# Altium PCB MSP-LITO-MSPM0L2228.PcbDoc
Units mil, origin at the board's own origin, x right, y up, seen from the top; angles counter-clockwise.
Board outline 1505.03 x 2085.03 mil, 2 copper layers (Top Layer, Bottom Layer); 41 components, 70 nets, 198 pads, 66 vias.
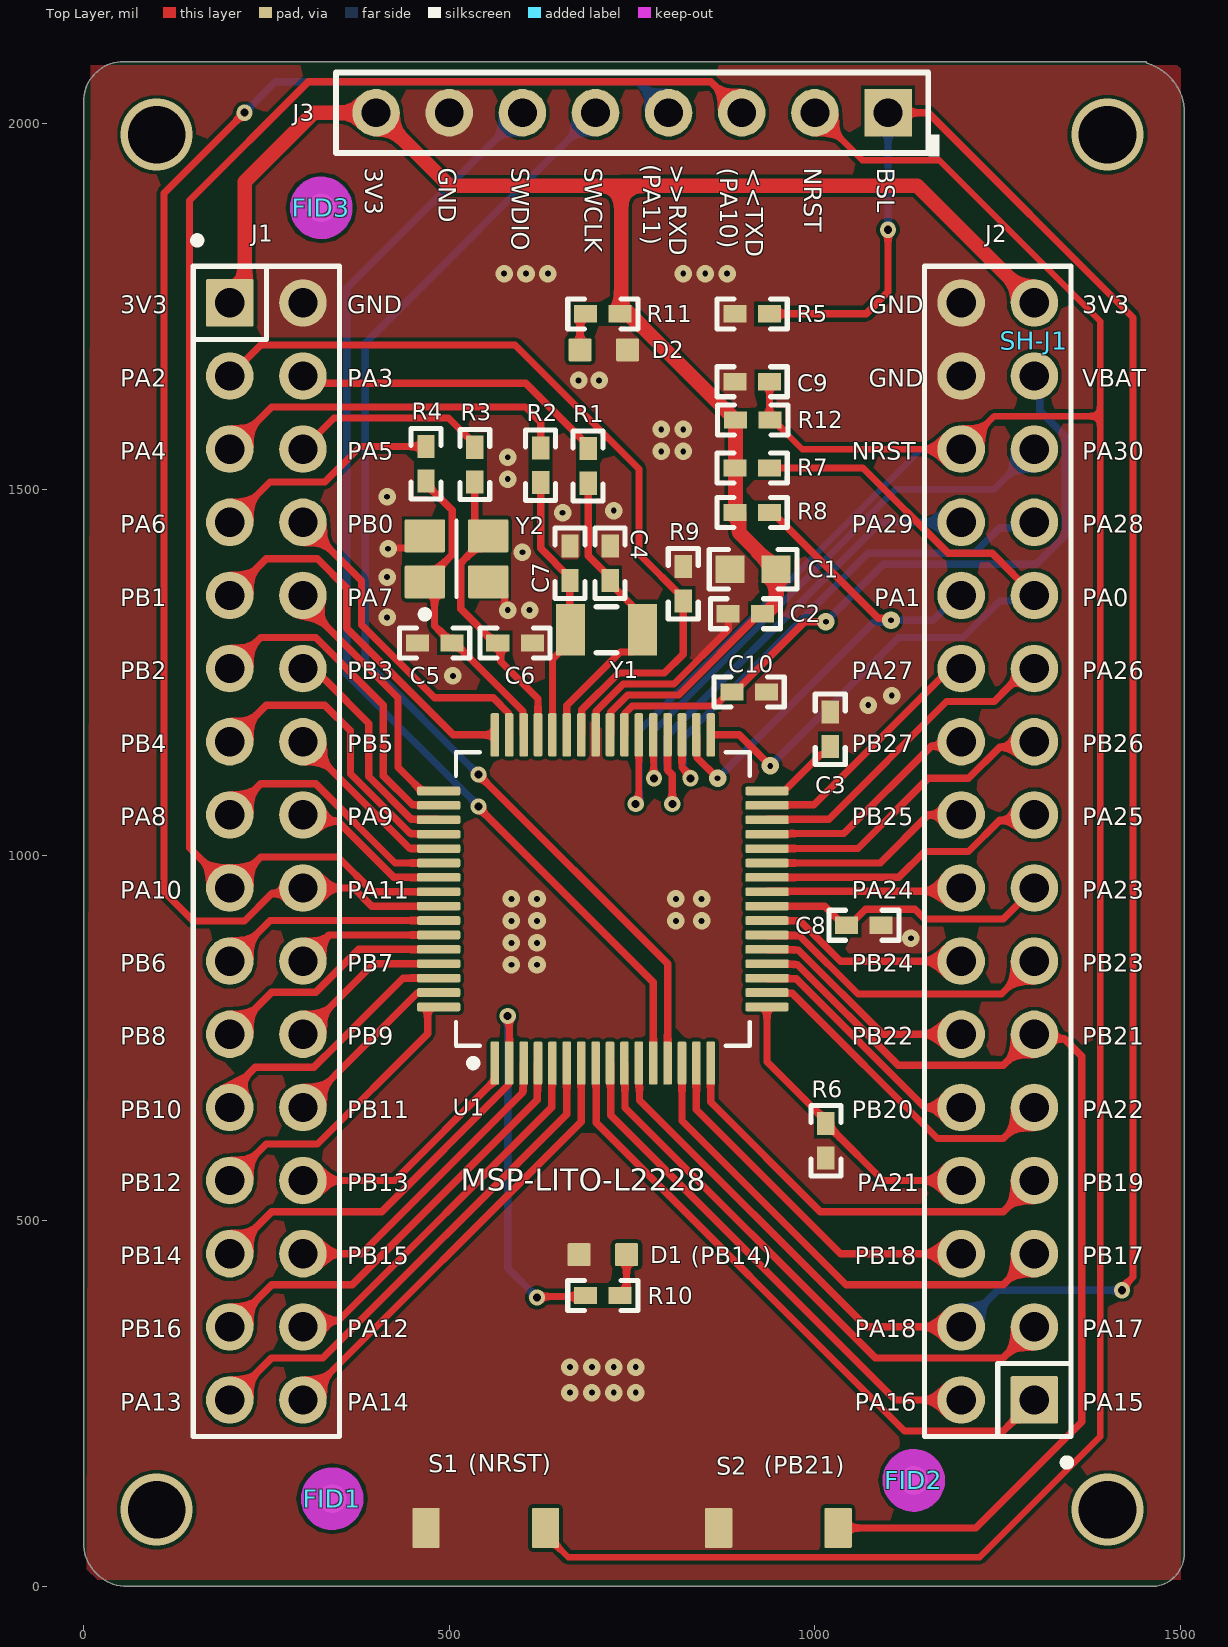
[diagram p0: Top Layer view]
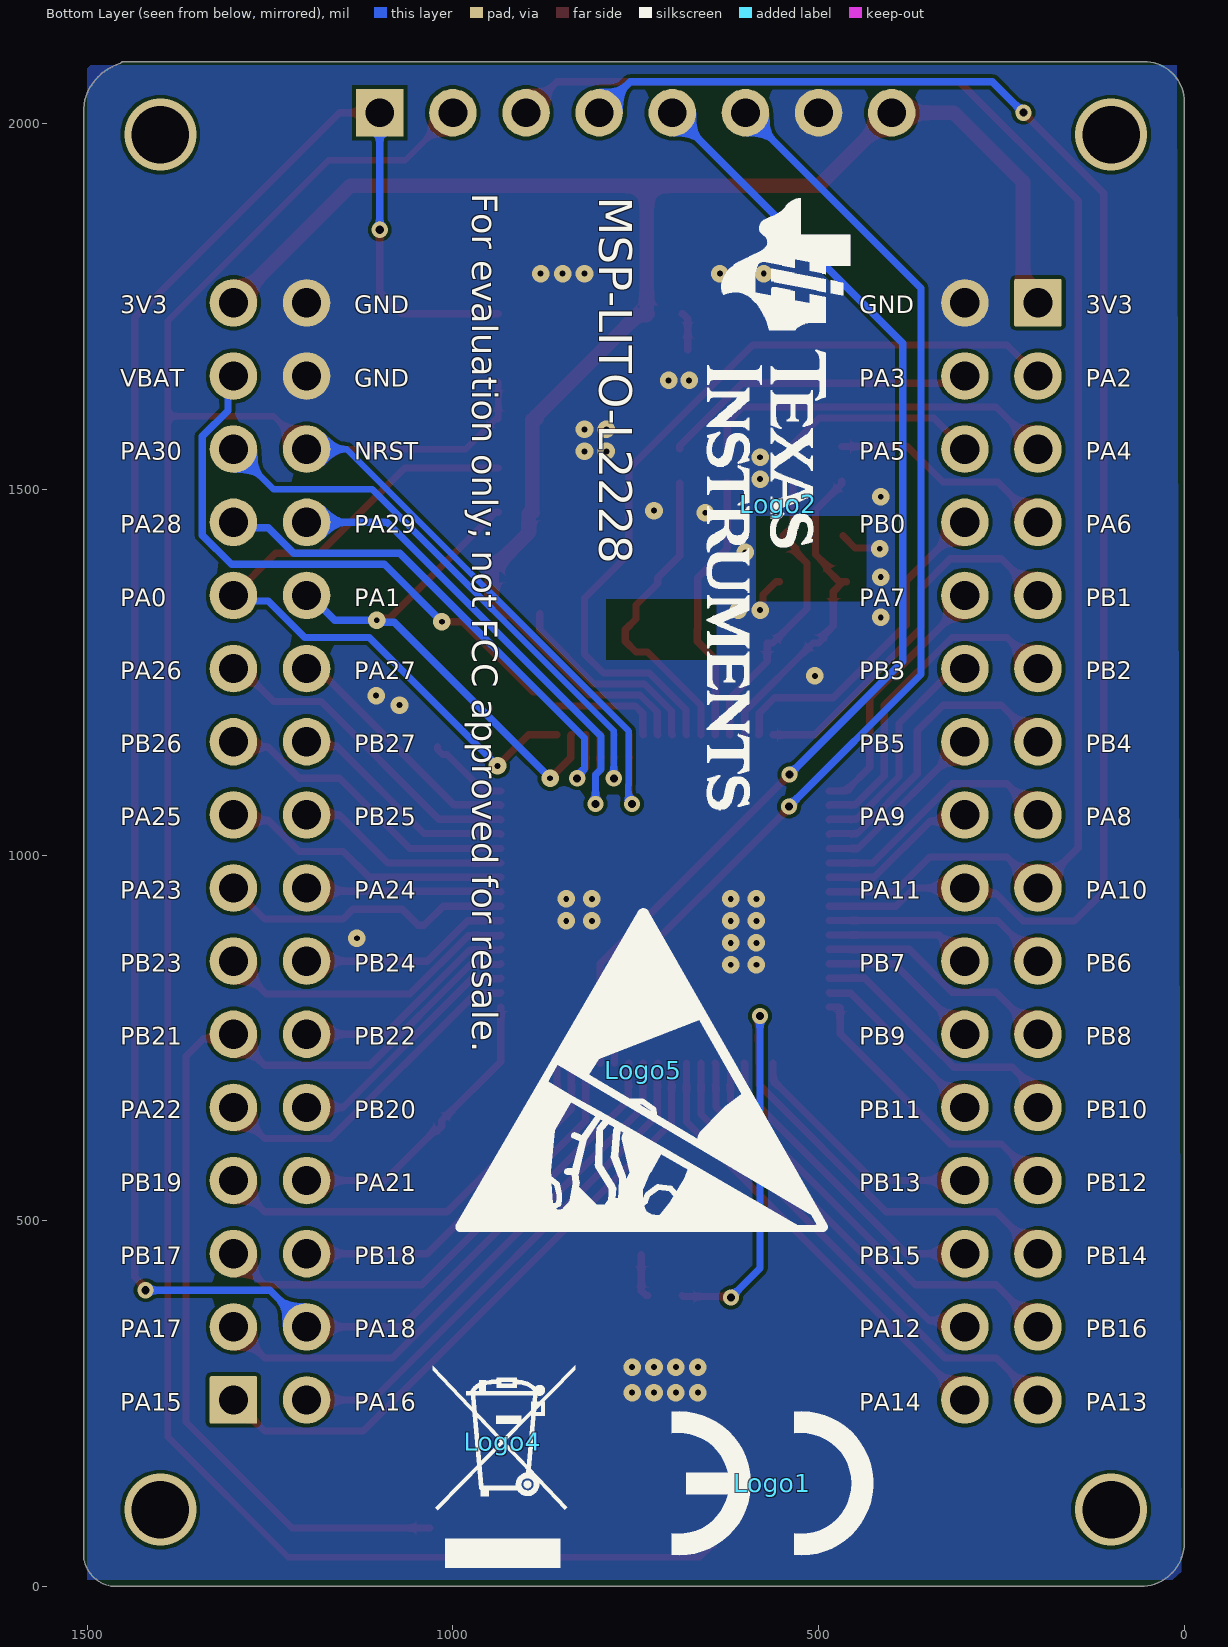
[diagram p1: Bottom Layer view, seen from below]

## Layer stack, top to bottom
Top Solder: solder mask 0.4, Solder Resist, Dk 3.5
Top Layer: signal copper 1.4
Dielectric 1: dielectric 12.6, FR-4, Dk 4.8
Bottom Layer: signal copper 1.4
Bottom Solder: solder mask 0.4, Solder Resist, Dk 3.5

## Board outline
0.01,59.98 0.01,2029.53 -0.01,2030 cw(c55,2030) 55,2085.02 1450,2085.02 cw(c1450,2080) 1454.36,2082.49 cw(c1435,2015) 1505,2020.38 1505.02,2020 1505.02,45 cw(c1460,45) 1460,-0.02 60,-0.02 cw(c60,59.98)

## Design rules (kind name [scope] priority, off if disabled: settings)
Clearance [All] p1: gap=5 ignorepadtopadclearanceinfootprint=FALSE
MinimumSolderMaskSliver [All] p1: minsoldermaskwidth=4
PolygonConnect [All] p1: connectstyle=Direct reliefconductorwidth=10 reliefentries=4 polygonreliefangle="90 Angle" airgapwidth=10
RoutingVias [All] p1: holewidth=11 width=22 viastyle="Through Hole" minholewidth=10 minwidth=10 maxholewidth=28 maxwidth=50
SilkToSilkClearance [All] p1: silktosilkclearance=0
SilkToSolderMaskClearance [IsPad] p1: minsilkscreentomaskgap=0 clearancetoexposedcopper=TRUE
SolderMaskExpansion [All] p1: expansion=1.9 istentingtop=FALSE
Width [All] p1: maxlimit=30 minlimit=8 preferedwidth=10
27 further rules are at their usual default settings.

## Classes and differential pairs
component class Shunt: SH-J1
component class Logo: Logo2
component class Header: J1 J2 J3
component class FiducialMark: FID1 FID2 FID3

## Components (designator, comment, footprint, x,y, rotation, side; value= is the part's Value field where it differs from the comment)
C1 "GRM188R60J106ME84" 0603 915.49,1390.86 r180 top value=10uF
C2 "GRM155R61H104ME14D" 0402 905,1330 r180 top value=0.1uF
C3 "GRM155R60J474KE19D" 0402 1021,1172 r90 top value=0.47uF
C4 "GCQ1555C1H140JB01D" 0402 720,1399 r270 top value=14pF
C5 "GCQ1555C1H140JB01D" 0402 480,1290 r180 top value=14pF
C6 "GCQ1555C1H140JB01D" 0402 590,1290 r0 top value=14pF
C7 "GCQ1555C1H140JB01D" 0402 665,1399 r270 top value=14pF
C8 "GRM155R61E105KA12D" 0402 1067,904 r0 top value=1uF
C9 "GRM155R71E103KA01D" 0402 914.23,1647.16 r180 top value=0.01uF
C10 "GRM155R61E105KA12D" 0402 910,1223 r0 top value=1uF
D1 "SML-D12U1WT86" LED_SMLD12_RED 710,453.64 r180 top value=Red
D2 "SML-D12U1WT86" LED_SMLD12_RED 711.38,1690.89 r0 top value=Red
FID1 "Fiducial" Fiducial10-20 340,120 r0 top
FID2 "Fiducial" Fiducial10-20 1135,145 r0 top
FID3 "Fiducial" Fiducial10-20 325,1885 r90 top
J1 "TSW-116-07-G-D" TSW-116-07-G-D 250,1005 r270 top
J2 "TSW-116-07-G-D" TSW-116-07-G-D 1250,1005 r90 top
J3 "PEC08SAAN" SULLINS_PEC08SAAN 750,2015 r180 top
Logo1 "CE Mark" CE_Mark_5mm 563,141 r0 bottom
Logo2 "Texas Instruments" TI_Stacked_Overlay_Small 555,1480 r270 bottom
Logo3 "FCC disclaimer" FCC_disclaimer -635,1085 r90 top
Logo4 "WEEE logo" WEEE_Minimum 932,198 r180 bottom
Logo5 "ESD Susceptible" ESD_Overlay_Large 740,706 r180 bottom
R1 "RC0402JR-070RL" 0402 690,1532 r270 top value=0
R2 "RC0402JR-070RL" 0402 625,1533 r270 top value=0
R3 "RC0402JR-070RL" 0402 535,1534 r270 top value=0
R4 "RC0402JR-070RL" 0402 468.19,1535 r270 top value=0
R5 "RC0402FR-0747KL" 0402 914.22,1740 r180 top value=47.0k
R6 "RC0402JR-070RL" 0402 1015,609.48 r90 top value=0
R7 "RC0402FR-072K2L" 0402 914.22,1529.12 r180 top value=2.20k
R8 "RC0402FR-072K2L" 0402 914.22,1468.54 r180 top value=2.20k
R9 "RG1005P-104-B-T5" 0402 820,1371 r90 top value=100k
R10 "RC0402FR-071KL" 0402 710,397.73 r180 top value=1.00k
R11 "RC0402FR-071KL" 0402 710,1740 r0 top value=1.00k
R12 "RC0402FR-0747KL" 0402 915,1595 r180 top value=47.0k
S1 "TL1015AF160QG" SW_TL1015AF160QG 550,80 r0 top
S2 "TL1015AF160QG" SW_TL1015AF160QG 950,80 r0 top
SH-J1 "SNT-100-BK-G" SNT-100-BK-G 1300,1703 r90 top value=VDD:VBAT
U1 "MSPM0L2228SPM" PM0064A-MFG 710,940 r90 top
Y1 "X1A0001410014" Epson_FC-135 715,1308 r0 top
Y2 "X1E0000210179" FP-X1E0000210179_TSX-3225-MFG 510,1405 r0 top

## Footprints (in the part's own frame and the unit in brackets; to place one, negate y for a bottom-side part, rotate by r counter-clockwise, add the part's x,y. Pads: shape width x height; smd on the part's side, far side on the other; paste and mask are expansions set on the pad)
0402 [mm] "0402 from SM-752 data"
  rect 0.8x0.6 smd: 1(-0.6,0) 2(0.6,0)
  silkscreen extent -1.22,-0.52 1.22,0.52, body extent -0.55,-0.3 0.55,0.3, height 0.6
0603 [mm] "0603 from SM-752 data"
  rect 1x0.95 smd: 1(-0.8,0) 2(0.8,0)
  silkscreen extent -1.52,-0.69 1.52,0.69, body extent -0.87,-0.47 0.87,0.47, height 1
CE_Mark_5mm [mil] "Minimum text height for CE Mark"
  silkscreen extent -138,-98 138,98
Epson_FC-135 [mm] "SMD, 2-Leads, Body 3.2x1.5mm"
  rect 1x1.8 smd: 1(-1.25,0) 2(1.25,0)
  silkscreen extent -0.35,-0.8 0.35,0.8, body extent -1.65,-0.8 1.65,0.8, height 0.9
ESD_Overlay_Large [mil]
  silkscreen extent -254,-219 250,219
FCC_disclaimer [mil]
Fiducial10-20 [mm]
  round 1 smd mask+0.5: 1(0,0)
  Top Layer keep-out circle w1.178: c0,0 r0.5
FP-X1E0000210179_TSX-3225-MFG [mm]
  rrect9% 1.4x1.15 smd paste+0 mask+0: 1(-1.1,-0.8) 2(1.1,-0.8) 3(1.1,0.8) 4(-1.1,0.8)
  silkscreen extent -1.22,-2.05 0,1.33, body extent -1.9,-1.47 1.9,1.47, height 0.25
LED_SMLD12_RED [mm] "SMD, 2-Leads, Body 1.6x0.8mm"
  rrect12% 0.8x0.8 smd: 1(-0.825,0) 2(0.825,0)
  body extent -0.8,-0.4 0.8,0.4, height 0.55
PM0064A-MFG [mm]
  rrect33% 1.5x0.3 smd paste+0 mask+0: 1(-5.7,3.75) 2(-5.7,3.25) 3(-5.7,2.75) 4(-5.7,2.25) 5(-5.7,1.75) 6(-5.7,1.25) 7(-5.7,0.75) 8(-5.7,0.25) 9(-5.7,-0.25) 10(-5.7,-0.75) 11(-5.7,-1.25) 12(-5.7,-1.75) 13(-5.7,-2.25) 14(-5.7,-2.75) 15(-5.7,-3.25) 16(-5.7,-3.75) 33(5.7,-3.75) 34(5.7,-3.25) 35(5.7,-2.75) 36(5.7,-2.25) 37(5.7,-1.75) 38(5.7,-1.25) 39(5.7,-0.75) 40(5.7,-0.25) 41(5.7,0.25) 42(5.7,0.75) 43(5.7,1.25) 44(5.7,1.75) 45(5.7,2.25) 46(5.7,2.75) 47(5.7,3.25) 48(5.7,3.75)
  rrect33% 0.3x1.5 smd paste+0 mask+0: 17(-3.75,-5.7) 18(-3.25,-5.7) 19(-2.75,-5.7) 20(-2.25,-5.7) 21(-1.75,-5.7) 22(-1.25,-5.7) 23(-0.75,-5.7) 24(-0.25,-5.7) 25(0.25,-5.7) 26(0.75,-5.7) 27(1.25,-5.7) 28(1.75,-5.7) 29(2.25,-5.7) 30(2.75,-5.7) 31(3.25,-5.7) 32(3.75,-5.7) 49(3.75,5.7) 50(3.25,5.7) 51(2.75,5.7) 52(2.25,5.7) 53(1.75,5.7) 54(1.25,5.7) 55(0.75,5.7) 56(0.25,5.7) 57(-0.25,5.7) 58(-0.75,5.7) 59(-1.25,5.7) 60(-1.75,5.7) 61(-2.25,5.7) 62(-2.75,5.7) 63(-3.25,5.7) 64(-3.75,5.7)
  silkscreen extent -5.82,-5.1 5.1,5.1, body extent -6.55,-6.55 6.55,6.55, height 0.25
SNT-100-BK-G [mil] "Samtec STEP model"
  round 1 on Mech3: 0(0,0)
  body extent -100,-50 100,50, height 344
SULLINS_PEC08SAAN [mm] "SULLINS"
  rect 1.65x1.65 hole 1: 1(-8.89,0)
  round 1.65 hole 1: 2(-6.35,0) 3(-3.81,0) 4(-1.27,0) 5(1.27,0) 6(3.81,0) 7(6.35,0) 8(8.89,0)
  silkscreen extent -10.67,-1.4 10.29,1.52, body extent -10.29,-1.33 10.29,1.33, height 8.38
SW_TL1015AF160QG [mm] "E-Switch"
  rrect11% 0.95x1.4 smd: 1(-2.075,0) 2(2.075,0)
  body extent -2.3,-1.5 2.3,1.5, height 2
TI_Stacked_Overlay_Small [mil]
  silkscreen extent -418,-98 418,98
TSW-116-07-G-D [mm] "Samtec 100mil, 2x16, 230 mil above insulator"
  rrect6% 1.65x1.65 hole 1.016: 1(-19.05,-1.27)
  round 1.65 hole 1.016: 2(-19.05,1.27) 3(-16.51,-1.27) 4(-16.51,1.27) 5(-13.97,-1.27) 6(-13.97,1.27) 7(-11.43,-1.27) 8(-11.43,1.27) 9(-8.89,-1.27) 10(-8.89,1.27) 11(-6.35,-1.27) 12(-6.35,1.27) 13(-3.81,-1.27) 14(-3.81,1.27) 15(-1.27,-1.27) 16(-1.27,1.27) 17(1.27,-1.27) 18(1.27,1.27) 19(3.81,-1.27) 20(3.81,1.27) 21(6.35,-1.27) 22(6.35,1.27) 23(8.89,-1.27) 24(8.89,1.27) 25(11.43,-1.27) 26(11.43,1.27) 27(13.97,-1.27) 28(13.97,1.27) 29(16.51,-1.27) 30(16.51,1.27) 31(19.05,-1.27) 32(19.05,1.27)
  silkscreen extent -21.34,-2.54 20.32,2.54, body extent -20.32,-2.54 20.32,2.54, height 8.38
WEEE_Minimum [mil] "WEEElie bin"
  silkscreen extent -95,-172 99,104

## Part data
C1: library part CMP-0007304-5, "CAP, CERM, 10 uF, 6.3 V, +/- 20%, X5R, 0603", Cap_Case=0603, Manufacturer=MuRata, Supplier Part Number 1=490-7316-1-ND, TempCo=X5R, Tolerance_%=20%, Value1=Unknown, Value2=6.3V, ValueDisplayed=10uF, AEC Category=Q200, AEC Qualified=?, Cap_F=10µF, ComponentLink1Description="Datasheet link", ComponentLink1URL=http://search.murata.co.jp/Ceramy/image/img/A01X/G101/ENG/GRM188R60J106ME84-01.pdf, CompType=Capacitor, LatestRevisionDate=2017-03-09, MountType=SMT, PackageReference=0603, PartNumber=GRM188R60J106ME84, Polarized=N, Published=2008-06-19, Publisher="Texas Instruments", RoHS=Y, SizeArea_mm2=1.28, SizeAreaWB_mm2=4.68, SizeX_mm=1.6, SizeY_mm=0.8, SizeZ_mm=1, Supplier 1=Digi-Key, TaMax_C=85°C, TaMin_C=-55°C, Technology=Ceramic, U/M=EA, VDC_V=6.3V
C2: library part CMP-0006614-2, "CAP, CERM, 0.1 uF, 50 V, +/- 20%, X5R, 0402", Cap_Case=0402, Manufacturer=MuRata, Supplier Part Number 1=GRM155R61H104ME14D-ND, TempCo=X5R, Tolerance_%=20%, Value1=Unknown, Value2=50V, ValueDisplayed=0.1uF, AEC Category=Q200, AEC Grade=N/A, AEC Qualified=N, Cap_F=100nF, ComponentLink1Description="Datasheet link", ComponentLink1URL=http://search.murata.co.jp/Ceramy/image/img/A01X/G101/ENG/GRM155R61H104ME14-01.pdf, CompType=Capacitor, LatestRevisionDate=2017-03-09, MountType=SMT, PackageReference=0402, PartNumber=GRM155R61H104ME14D, Polarized=N, Published=2008-06-19, Publisher="Texas Instruments", RoHS=Y, SizeArea_mm2=0.5, SizeAreaWB_mm2=3, SizeX_mm=1, SizeY_mm=0.5, SizeZ_mm=0.6, Supplier 1=Digi-Key, Supplier 2=Mouser, Supplier Part Number 2=81-GRM155R61H104ME4D, TaMax_C=85°C, TaMin_C=-55°C, Technology=Ceramic, U/M=EA, VDC_V=50V
C3: library part CMP-0006551-2, "CAP, CERM, 0.47 uF, 6.3 V, +/- 10%, X5R, 0402", Cap_Case=0402, Manufacturer=MuRata, Supplier Part Number 1=490-3266-1-ND, TempCo=X5R, Tolerance_%=10%, Value1=Unknown, Value2=6.3V, ValueDisplayed=0.47uF, AEC Category=Q200, AEC Qualified=?, Cap_F=470nF, ComponentLink1Description="Datasheet link", ComponentLink1URL=http://search.murata.co.jp/Ceramy/PnsearchViewAction.do?HnOFG=ON&HnNFG=ON&SEL_CNT=50&sLang=en&sKey=GRM155R60J474KE19D&x=9&y=9&search=startwith, CompType=Capacitor, LatestRevisionDate=2017-03-09, MountType=SMT, PackageReference=0402, PartNumber=GRM155R60J474KE19D, Polarized=N, Published=2008-06-19, Publisher="Texas Instruments", RoHS=Y, SizeArea_mm2=0.5, SizeAreaWB_mm2=3, SizeX_mm=1, SizeY_mm=0.5, SizeZ_mm=0.6, Supplier 1=Digi-Key, Supplier 2=Newark, Supplier 3=Mouser, Supplier Part Number 2=38K1645, Supplier Part Number 3=81-GRM155R60J474KE9D, TaMax_C=85°C, TaMin_C=-55°C, Technology=Ceramic, U/M=EA, VDC_V=6.3V
C4 C5 C6 C7: library part CMP-0860834-1, "CAP, CERM, 14 pF, 50 V,+/- 5%, C0G/NP0, AEC-Q200 Grade 1, 0402", Cap_Case=0402, Manufacturer=MuRata, TempCo=C0G/NP0, Tolerance_%=5%, Value2=50V, ValueDisplayed=14pF, AEC Category=Q200, AEC Grade=1, AEC Qualified=Y, Cap_F=14pF, ComponentLink1Description="Datasheet link", ComponentLink1URL=https://search.murata.co.jp/Ceramy/image/img/A01X/G101/ENG/GCQ1555C1H140JB01-01.pdf, CompType=Capacitor, MountType=SMT, PackageReference=0402, PartNumber=GCQ1555C1H140JB01D, Polarized=N, RoHS=Y, SizeArea_mm2=0.5, SizeAreaWB_mm2=3, SizeX_mm=1, SizeY_mm=0.5, SizeZ_mm=0.6, TaMax_C=125°C, TaMin_C=-55°C, Technology=Ceramic, U/M=EA, VDC_V=50V
C8: library part CMP-0006608-2, "CAP, CERM, 1 uF, 25 V, +/- 10%, X5R, 0402", Cap_Case=0402, Manufacturer=MuRata, Supplier Part Number 1=490-10017-1-ND, TempCo=X5R, Tolerance_%=10%, Value1=Unknown, Value2=25V, ValueDisplayed=DNC, AEC Category=Q200, AEC Qualified=?, Cap_F=1µF, ComponentLink1Description="Datasheet link", ComponentLink1URL=http://psearch.murata.com/capacitor/product/GRM155R61E105KA12%23.pdf, CompType=Capacitor, LatestRevisionDate=2017-03-09, MountType=SMT, PackageReference=0402, PartNumber=GRM155R61E105KA12D, Polarized=N, Published=2008-06-19, Publisher="Texas Instruments", RoHS=Y, SizeArea_mm2=0.5, SizeAreaWB_mm2=3, SizeX_mm=1, SizeY_mm=0.5, SizeZ_mm=0.6, Supplier 1=Digi-Key, Supplier 2=Newark, Supplier 3=Mouser, Supplier Part Number 2=48W5730, Supplier Part Number 3=81-GRM155R61E105KA2D, TaMax_C=85°C, TaMin_C=-55°C, Technology=Ceramic, U/M=EA, VDC_V=25V
C9: library part CMP-0006658-2, "CAP, CERM, 0.01 uF, 25 V, +/- 10%, X7R, 0402", Cap_Case=0402, Manufacturer=MuRata, Supplier Part Number 1=490-1312-1-ND, TempCo=X7R, Tolerance_%=10%, Value1=Unknown, Value2=25V, ValueDisplayed=0.01uF, AEC Category=Q200, AEC Qualified=?, Cap_F=10nF, ComponentLink1Description="Datasheet link", ComponentLink1URL=http://search.murata.co.jp/Ceramy/PnsearchViewAction.do?HnOFG=ON&HnNFG=ON&SEL_CNT=50&sLang=en&sKey=GRM155R71E103KA01D&x=9&y=9&search=startwith, CompType=Capacitor, LatestRevisionDate=2017-03-09, MountType=SMT, PackageReference=0402, PartNumber=GRM155R71E103KA01D, Polarized=N, Published=2008-06-19, Publisher="Texas Instruments", RoHS=Y, SizeArea_mm2=0.5, SizeAreaWB_mm2=3, SizeX_mm=1, SizeY_mm=0.5, SizeZ_mm=0.6, Supplier 1=Digi-Key, Supplier 2=Mouser, Supplier 3=Farnell, Supplier Part Number 2=81-GRM36X103K25, Supplier Part Number 3=8819734, TaMax_C=125°C, TaMin_C=-55°C, Technology=Ceramic, U/M=EA, VDC_V=25V
C10: library part CMP-0006608-2, "CAP, CERM, 1 uF, 25 V, +/- 10%, X5R, 0402", Cap_Case=0402, Manufacturer=MuRata, Supplier Part Number 1=490-10017-1-ND, TempCo=X5R, Tolerance_%=10%, Value1=Unknown, Value2=25V, AEC Category=Q200, AEC Qualified=?, Cap_F=1µF, ComponentLink1Description="Datasheet link", ComponentLink1URL=http://psearch.murata.com/capacitor/product/GRM155R61E105KA12%23.pdf, CompType=Capacitor, LatestRevisionDate=2017-03-09, MountType=SMT, PackageReference=0402, PartNumber=GRM155R61E105KA12D, Polarized=N, Published=2008-06-19, Publisher="Texas Instruments", RoHS=Y, SizeArea_mm2=0.5, SizeAreaWB_mm2=3, SizeX_mm=1, SizeY_mm=0.5, SizeZ_mm=0.6, Supplier 1=Digi-Key, Supplier 2=Newark, Supplier 3=Mouser, Supplier Part Number 2=48W5730, Supplier Part Number 3=81-GRM155R61E105KA2D, TaMax_C=85°C, TaMin_C=-55°C, Technology=Ceramic, U/M=EA, VDC_V=25V
D1 D2: library part CMP-0086209-1, "LED, Red, SMD", Color=Red, Manufacturer=Rohm, Power_TotalModule=54mW, Value1=0.054W, Value2=2.2V, ComponentLink1Description="Datasheet link", ComponentLink1URL=https://www.rohm.com/datasheet/SML-D12U1W, CompType=LED, Io_A=20mA, Ir_A=10mA, MountType=SMT, PackageReference=1.6x0.8mm, PartNumber=SML-D12U1WT86, RoHS=Y, SizeArea_mm2=1.28, SizeAreaWB_mm2=4.68, SizeX_mm=1.6, SizeY_mm=0.8, SizeZ_mm=0.65, Type=?, Vf_V=2.2V, Vr_V=5V
FID1 FID2 FID3: library part CMP-0077181-1, "Fiducial mark.  There is nothing to buy or mount.", Manufacturer=N/A, ClassName=FiducialMark, CompType=Fiducial, MountType=N/A, PackageReference=N/A, PartNumber=N/A
J1 J2: library part CMP-0075429-1, "Header, 100mil, 16x2, Gold, TH", Color=Black, Current_A=6.3A, Manufacturer=Samtec, Supplier Part Number 1=SAM1028-16-ND, Voltage_V=550V, Cert_CSA=Y, Cert_CULUS=N, Cert_UL=Y, Cert_VDE=N, ClassName=Header, CNHeader=True, ComponentLink1Description="Datasheet URL", ComponentLink1URL=http://samtec.com/ftppub/pdf/TSW_TH.PDF, CompType=Header, ContactFinish=Gold, CT=False, Gender=Male, Green_EU RoHS=Passed, Green_EU RoHS-2=Passed, Green_Lifecycle=Active, Green_REACh=Passed, LatestRevisionDate=2017-07-12, MountType=TH, Orientation=Vertical, PackageReference="16x2 Header", PartNumber=TSW-116-07-G-D, PinCount=32, Pitch_mm=2.54, Publisher="Texas Instruments", RoHS=Y, Row_Count=2, RowSpacing_mm=2.54, Shrouded=N, Supplier 1=Digi-Key
J3: library part CMP-0054563-1, "Header, 100mil, 8x1, Tin, TH", Color=Black, Current_A=3A, Manufacturer="Sullins Connector Solutions", Supplier Part Number 1=S1012E-08-ND, Voltage_V=1.8kV, Cert_UL=Y, ClassName=Header, CNHeader=TRUE, ComponentLink1Description="Datasheet URL", ComponentLink1URL=http://www.sullinscorp.com/catalogs/77_PAGE108-109_.100_MALE_HDR.pdf, CompType=Header, ContactFinish=Tin, CT=FALSE, Gender=Male, Green_EU RoHS=Incomplete, Green_EU RoHS-2=Incomplete, Green_Lifecycle="Not Set", Green_REACh=Incomplete, LatestRevisionDate=26/05/2017, MountType=TH, Orientation=Vertical, PackageReference="Header, 8x1, 100mil, TH", PartNumber=PEC08SAAN, PinCount=8, Pitch_mm=2.54, Publisher="Texas Instruments", RoHS=Y, Row_Count=1, Shrouded=N, Supplier 1=Digi-Key
Logo1: library part CMP-0074844-2, Manufacturer="Texas Instruments", AEC Category=Q200, ComponentLink1Description="Datasheet Link", ComponentLink1URL=http://www.ti.com/lit/ds/symlink/GPN.pdf, ComponentLink2Description="Product Folder", ComponentLink2URL=http://www.ti.com/product/GPN, ComponentLink3Description="Online Datasheet", ComponentLink3URL=http://www.ti.com/product/GPN/datasheet, CompType=IC, LatestRevisionDate=2017-07-06, Lib Reference="CE Mark", PartNumber="CE Mark", Published=2009-03-03, Publisher="Texas Instruments", SymbolCreator=a0412235
Logo2: library part CMP-0074838-1, "Texas Instrument Corporate Signature", ClassName=Logo, LatestRevisionDate=2017-07-06, Lib Reference=TI_Logo, PartNumber="Texas Instruments", Published=2009-03-03, Publisher="Texas Instruments", SymbolCreator=a0412235, SymbolVersion=2011-08-22
Logo3: library part CMP-0074847-1, "FCC_disclaimer", LatestRevisionDate=2017-07-06, Lib Reference=FCC_disclaimer, PartNumber="FCC disclaimer", Published=2009-03-03, Publisher="Texas Instruments"
Logo4: library part CMP-0074769-4, Manufacturer="Texas Instruments", AEC Category=Q200, ComponentLink1Description="Datasheet Link", ComponentLink1URL=http://www.ti.com/lit/ds/symlink/GPN.pdf, ComponentLink2Description="Product Folder", ComponentLink2URL=http://www.ti.com/product/GPN, ComponentLink3Description="Online Datasheet", ComponentLink3URL=http://www.ti.com/product/GPN/datasheet, CompType=IC, Lib Reference="WEEE logo", PartNumber="WEEE logo"
Logo5: library part CMP-0074840-1, "ESD Susceptible Symbol", LatestRevisionDate=2017-07-06, Lib Reference=ESD_Susceptible, PartNumber="ESD Susceptible", Published=2009-03-03, Publisher="Texas Instruments", SymbolCreator=a0412235, SymbolVersion=2011-08-22
R1 R2 R3 R4 R6: library part CMP-0027004-2, "RES, 0, 5%, 0.063 W, 0402", Manufacturer="Yageo America", Power_W=63mW, Supplier Part Number 1=311-0.0JRCT-ND, TempCo="200 ppm/C", Tolerance_%=5%, Value2=0.063W, Value_Code=0000, ValueDisplayed=DNC, AEC Category=Q200, AEC Qualified=?, ComponentLink1Description="Datasheet link", ComponentLink1URL=http://www.yageo.com/pdf/Pu-RC0402_51_PbFree_L_2.pdf, CompType=Resistor, EIA_Code=E24, LatestRevisionDate=2017-03-09, MountType=SMT, PackageReference=0402, PartNumber=RC0402JR-070RL, Published=2008-06-26, Publisher="Texas Instruments", Res_ohm=0, RoHS=Y, SizeArea_mm2=0.5, SizeX_mm=1, SizeY_mm=0.5, SizeZ_mm=0.6, Supplier 1=Digi-Key, Supplier 2=Mouser, Supplier 3=Farnell, Supplier Part Number 2=603-RC0402JR-070RL, Supplier Part Number 3=9232516, Technology="Thick Film", U/M=EA, Value1=5%, VDC_V=50V
R5 R12: library part CMP-0026737-1, "RES, 47.0 k, 1%, 0.0625 W, 0402", Manufacturer="Yageo America", Power_W=62.5mW, Supplier Part Number 1=311-47.0KLRCT-ND, TempCo="100 ppm/C", Tolerance_%=1%, Value2=0.0625W, Value_Code=47k0, ValueDisplayed=47.0k, AEC Category=Q200, AEC Grade=N/A, AEC Qualified=N, ComponentLink1Description="Datasheet link", ComponentLink1URL=http://www.yageo.com/documents/recent/PYu-RC0402_51_RoHS_L_6_r.pdf, CompType=Resistor, LatestRevisionDate=2017-03-09, MountType=SMT, PackageReference=0402, PartNumber=RC0402FR-0747KL, Published=2008-06-26, Publisher="Texas Instruments", Res_ohm=47k, RoHS=Y, SizeArea_mm2=0.5, SizeX_mm=1, SizeY_mm=0.5, SizeZ_mm=0.6, Supplier 1=Digi-Key, Supplier 2=Newark, Supplier 3=Mouser, Supplier Part Number 2=67R9937, Supplier Part Number 3=603-RC0402FR-0747KL, Technology="Thick Film", U/M=EA, Value1=1%, VDC_V=50V
R7 R8: library part CMP-0026729-1, "RES, 2.20 k, 1%, 0.063 W, 0402", Manufacturer="Yageo America", Power_W=63mW, Supplier Part Number 1=311-2.20KLRCT-ND, TempCo="100 ppm/C", Tolerance_%=1%, Value2=0.063W, Value_Code=2k20, ValueDisplayed=2.20k, AEC Category=Q200, AEC Grade=N/A, AEC Qualified=N, ComponentLink1Description="Datasheet link", ComponentLink1URL=http://www.yageo.com/documents/recent/PYu-RC_Group_51_RoHS_L_1.pdf, CompType=Resistor, LatestRevisionDate=2017-03-09, MountType=SMT, PackageReference=0402, PartNumber=RC0402FR-072K2L, Published=2008-06-26, Publisher="Texas Instruments", Res_ohm=2.2k, RoHS=Y, SizeArea_mm2=0.5, SizeX_mm=1, SizeY_mm=0.5, SizeZ_mm=0.6, Supplier 1=Digi-Key, Supplier 2=Newark, Supplier 3=Mouser, Supplier Part Number 2=67R9903, Supplier Part Number 3=603-RC0402FR-072K2L, Technology="Thick Film", U/M=EA, Value1=1%
R9: library part CMP-0026815-1, "RES, 100 k, 0.1%, 0.063 W, 0402", Manufacturer="Susumu Co Ltd", Power_W=63mW, Supplier Part Number 1=RG10P100KBCT-ND, TempCo="25 ppm/C", Tolerance_%=0.1%, Value2=0.063W, Value_Code=100k, AEC Category=Q200, AEC Qualified=?, ComponentLink1Description="Datasheet link", ComponentLink1URL=http://www.susumu-usa.com/pdf/RG_Data_Sheet.pdf, CompType=Resistor, EIA_Code=E192, LatestRevisionDate=2017-03-09, MountType=SMT, PackageReference=0402, PartNumber=RG1005P-104-B-T5, Published=2008-06-26, Publisher="Texas Instruments", Res_ohm=100k, RoHS=Y, SizeArea_mm2=0.5, SizeX_mm=1, SizeY_mm=0.5, SizeZ_mm=0.6, Supplier 1=Digi-Key, Supplier 2=Newark, Supplier 3=Mouser, Supplier Part Number 2=85K1460, Supplier Part Number 3=754-RG1005P-104-B-T5, Technology="Thin Film", U/M=EA, Value1=0.1%, ValueDisplayed=100k
R10 R11: library part CMP-0026725-1, "RES, 1.00 k, 1%, 0.0625 W, 0402", Manufacturer="Yageo America", Power_W=62.5mW, Supplier Part Number 1=311-1.00KLRCT-ND, TempCo="100 ppm/C", Tolerance_%=1%, Value2=0.0625W, Value_Code=1k00, ValueDisplayed=1.00k, AEC Category=Q200, AEC Grade=N/A, AEC Qualified=N, ComponentLink1Description="Datasheet link", ComponentLink1URL=http://www.yageo.com/NewPortal/yageodocoutput?fileName=/pdf/R-Chip/PYu-RC_Group_51_RoHS_L_4.pdf, CompType=Resistor, EIA_Code=E96, LatestRevisionDate=2017-03-09, MountType=SMT, PackageReference=0402, PartNumber=RC0402FR-071KL, Published=2008-06-26, Publisher="Texas Instruments", Res_ohm=1k, RoHS=Y, SizeArea_mm2=0.5, SizeX_mm=1, SizeY_mm=0.5, SizeZ_mm=0.6, Supplier 1=Digi-Key, Supplier 2=Newark, Supplier 3=Mouser, Supplier Part Number 2=98K7497, Supplier Part Number 3=603-RC0402FR-071KL, Technology="Thick Film", U/M=EA, Value1=1%, VDC_V=50V
S1 S2: library part CMP-0002143-3, "Switch, Tactile, SPST-NO, 0.05A, 12V, SMT", CurrentRating_mA=50A, Manufacturer=E-Switch, Supplier Part Number 1=EG4344CT-ND, Circuit=SPST-NO, ComponentLink1Description="Datasheet URL", ComponentLink1URL=http://spec.e-switch.com/P-J/P420000.pdf, CompType=Switch, LatestRevisionDate=2017-03-09, MountType=SMT, Orientation="Top Actuated", PackageReference="Switch, 4.4x2x2.9 mm", PartNumber=TL1015AF160QG, PositionCount=1, Publisher="Texas Instruments", RoHS=Y, Supplier 1=Digi-Key, Supplier 2=Newark, Supplier 3=Mouser, Supplier Part Number 2=15N4458, Supplier Part Number 3=612-TL1015AF, SwitchFunction=Off-Mom, VDC_V=12V
SH-J1: library part CMP-0003623-3, "Shunt, 100mil, Gold plated, Black", Alternate Manufacturer=3M, Alternate PartNumber=969102-0000-DA, Manufacturer=Samtec, Supplier Part Number 1=SAM8858-ND, ClassName=Shunt, ComponentLink1Description="Datasheet Link", ComponentLink1URL=http://www.samtec.com/ftppub/pdf/SNT.PDF, CompType=Shunt, MountType=N/A, PackageReference=Shunt, PartNumber=SNT-100-BK-G, RoHS=Y, Supplier 1=Digi-Key
U1: library part CMP-0121756-1, "Mixed-Signal Microcontroller, LQFP64", Frequency_Fixed=32MHz, Manufacturer="Texas Instruments", Max Supply Voltage=3.6V, Min Supply Voltage=1.62V, Operating Temperature Range="-40°C to +125°C", AEC Qualified=No, Core Architecture="ARM Cortex-M0+", Data Bus Width=32bits, Datasheet Path=datasheets/IC-MSPM0L2228SPM.pdf, helpURL=https://upverter.com/upn/revision/e3d91dc85fdb9748/, Interface=I2C,SPI,UART,LIN,IrDA,SMBus,Other, Memory Size=256KBytes, Memory Type=FLASH, Number Of A/D Converters=1, Number Of Adc Channels=26, Number Of Cores=1, Number Of I2C Channels=3, Number Of I/Os=59, Number Of Pwm Channels=18, Number Of Spi Channels=2, Number Of Timers/Counters=6, Number Of Uart Channels=5, PackageReference=LQFP64, Part Number=MSPM0L2228SPM, PartNumber=MSPM0L2228SPM, Ram Size=32KBytes, RoHS=UNKNOWN, SizeZ_mm=1.6mm, Standoff Height=0.05mm
Y1: library part CMP-0004693-3, "Crystal, 32.768 KHz, 12.5 pF, SMD", Frequency_Fixed=32.768kHz, Manufacturer=Epson, ComponentLink1Description="Datasheet Link", ComponentLink1URL=https://support.epson.biz/td/api/doc_check.php?dl=brief_FC-135R_en.pdf, CompType=Crystal, MountType=SMT, PackageReference="SMD, 2-Leads, Body 3.2x1.5mm", PartNumber=X1A0001410014, RoHS=Y, TaMax_C=85°C, TaMin_C=-40°C
Y2: library part CMP-0098168-2, "Crystal 40MHz ±10ppm (Tol) ±20ppm (Stability) 12pF FUND 40Ohm 4-Pin Mini-CSMD T/R", Frequency Stability=20ppm, Frequency Tolerance=10ppm, Frequency_Fixed=40MHz, Load Capacitance=12pF, Manufacturer="Seiko Epson", Operating Temperature Range="-40°C to +105°C", AEC Qualified=No, ComponentLink1Description=Datasheet, ComponentLink1URL=https://support.epson.biz/td/api/doc_check.php?mode=dl&lang=en&Parts=X1E0000210179, datasheet=https://support.epson.biz/td/api/doc_check.php?mode=dl&lang=en&Parts=X1E0000210179, Datasheet Path=datasheets/Crys-X1E0000210179.pdf, Esr=40, helpURL=https://upverter.com/upn/revision/08d7803d4c2c7fb7/, Lead Free=Yes, PackageReference=TSX-3225, Part Number=X1E0000210179, PartNumber=X1E0000210179, RoHS=TRUE, Series=TSX-3225, SizeZ_mm=0.6mm, Tolerance_%=10ppm

## Via types
v1: diameter 24, hole 8, Top Layer to Bottom Layer, tented both sides, 51 vias
v2: diameter 22, hole 11, Top Layer to Bottom Layer, tented both sides, 11 vias
v3: diameter 98.43, hole 78.74, Top Layer to Bottom Layer, 4 vias

## Nets (pads, with @x,y where several pads share a name; then routed paths per layer and width w, separated by ;. In a path a pad name is that pad's centre, name@x,y a point inside that pad or via, vN(x,y) a via of type N, cw(c..) or ccw(c..) an arc to the next point about the centre after c; other vN are vias at no path point)
3V3: C1.1 C2.1 J1.1 J2.31 J3.8 R7.2 R8.2 R11.2 R12.2 U1.40 | length 2386.9
  Top Layer w10: U1.40 720.75,1165.31 720.75,1195.59 744.09,1218.94 813.62,1218.94 924.68,1330 C2.1
  Top Layer w20: J1.1 220.53,1775.53 220.53,1920.53 315,2015 J3.8 500,1915 735,1915 ; R8.2 894.53,1468.54 896.34,1466.73 896.34,1440.52 946,1390.86 C1.1 946.98,1344.42 C2.1@932.56,1330 ; R8.2@891.38,1470 R12.2 887.44,1595 885.63,1596.81 885.63,1600.75 748.19,1738.19 735.43,1738.19 R11.2 735,1741.38 735,1915 ; J2.31 1140,1915 735,1915
GND: C1.2 C2.2 C3.2 C4.1 C5.2 C6.2 C7.1 C8.2 C9.2 C10.2 D1.2 D2.2 J1.2 J2.30 J2.32 J3.7 R5.2 R6.1 R9.2 S1.1 S2.1 U1.41 Y2.2 Y2.4 | length 391.4
  Top Layer w10: v1(416.4,1418.92) 417.38,1419.91 450.11,1419.91 Y2.4 ; Y2.2 558.23,1373.5 575.87,1355.87 575.87,1342.92 580,1338.79 v1(580,1335) ; U1.41 701.06,1165.31 701.06,1197.12 737.88,1233.94 807.41,1233.94 881.38,1307.91 C2.2
  other v1: 665,265 695,265 725,265 755,265 665,300 695,300 725,300 755,300 585,850 620,850 585,880 620,880 1131.21,886.24 585,910 620,910 810,910 845,910 585,940 620,940 810,940 845,940 1073,1205 1105,1218 505,1245 415,1325 610,1335 415,1380 600,1414 655,1468 725,1471 415,1490 580,1514 580,1544 790,1552 820,1552 790,1582 820,1582 677,1649 705,1649 575,1795 605,1795 635,1795 820,1795 850,1795 880,1795
NetC3_1: C3.1 U1.32 | length 114.1
  Top Layer w10: U1.32 958.03,1087.64 1008.02,1137.63 1014.19,1137.63 1021,1144.44 C3.1
NetD1_1: D1.1 R10.1 | length 60.8
  Top Layer w10: R10.1 735.67,397.73 742.48,404.54 D1.1
NetD2_1: D2.1 R11.1 | length 52.6
  Top Layer w10: D2.1 678.9,1733.19 685.71,1740 R11.1
PA.0: J2.23 R7.1 U1.33 | length 990.7
  Top Layer w10: U1.33 896.59,1164.41 v1(939,1122) ; R7.1 1065.81,1529.12 1182.4,1412.52 1242.48,1412.52 J2.23
  Bottom Layer w10: v1(939,1122) 1114.48,1297.48 1202.56,1297.48 1252.52,1347.44 1292.44,1347.44 J2.23
PA.1: J2.24 R8.1 U1.34 | length 735.3
  Top Layer w10: U1.34 838.86,1163.5 838.86,1133.14 v1(867,1105) ; R8.1 941.78,1468.54 1086.64,1323.68 1101.32,1323.68 v1(1104,1321)
  Bottom Layer w10: v1(867,1105) 1080.32,1318.32 1101.32,1318.32 v1(1104,1321) 1161.5,1321 1195.5,1355 J2.24
PA.2_ROSC: J1.3 R9.1 U1.42 | length 1130.2
  Top Layer w10: J1.3 242.48,1697.48 589.84,1697.48 759.57,1527.75 759.57,1411.74 820,1351.32 R9.1 820,1274.79 794.14,1248.94 731.67,1248.94 681.38,1198.65 681.38,1165.31 U1.42
PA.3-: J1.4 R1.1 | length 433.5
  Top Layer w10: J1.4 310,1645 604.56,1645 690,1559.56 R1.1
PA.3_LFXIN: C4.2 R1.2 U1.43 Y1.2 | length 426.8
  Top Layer w10: U1.43 660.79,1204.57 733.78,1277.57 749.53,1277.57 764.21,1292.25 Y1.2 749.53,1322.69 749.53,1341.91 720,1371.44 C4.2 720,1379.32 690,1409.32 R1.2
PA.4-: J1.5 R2.1 | length 492.6
  Top Layer w10: J1.5 257.52,1612.52 604.23,1612.52 625,1591.75 R2.1
PA.4_LFXOUT: C7.2 R2.2 U1.44 Y1.1 | length 372.1
  Top Layer w10: R2.2 625,1419.32 665,1379.32 C7.2 665,1308.79 Y1.1 665.79,1292.25 641.1,1267.57 U1.44
PA.5-: J1.6 R3.1 | length 271.4
  Top Layer w10: J1.6 342.52,1597.52 499.04,1597.52 535,1561.56 R3.1
PA.5_HFXIN: C6.1 R3.2 U1.45 Y2.3 | length 413.5
  Top Layer w10: R3.2 535,1449.88 548.39,1436.5 530.75,1418.86 530.75,1413.94 522.95,1406.14 522.8,1406.14 515.75,1399.09 515.75,1336.69 562.44,1290 C6.1 570.32,1290 570.32,1264.68 621.42,1213.58 U1.45
PA.6-: J1.7 R4.1 | length 311.1
  Top Layer w10: J1.7 255,1510 330,1510 378.62,1558.62 R4.1
PA.6_HFXOUT: C5.1 R4.2 U1.46 Y2.1 | length 445.8
  Top Layer w10: Y2.1@461.77,1373.5 Y2.1 ; R4.2 468.19,1507.44 504.25,1471.38 504.25,1410.91 489.25,1395.91 489.25,1391.14 471.61,1373.5 Y2.1 ; U1.46 600.83,1165.31 600.83,1196.73 507.56,1290 499.68,1290 492.87,1296.81 492.87,1300.75 480,1313.62 480,1360.2 Y2.1
PA.7: J1.10 U1.49 | length 358.1
  Top Layer w10: J1.10 300,1345 430,1215 430,1120 461.06,1088.94 461.06,1088.54 461.97,1087.64 U1.49
PA.8: J1.15 U1.54 | length 348
  Top Layer w10: J1.15 242.48,1097.48 317.6,1097.48 425.87,989.21 U1.54
PA.9: J1.16 U1.55 | length 221
  Top Layer w10: J1.16 308.61,1046.39 347.48,1046.39 424.34,969.53 U1.55
PA.10_Debug_TX: J1.17 J3.3 U1.56 | length 2125.6
  Top Layer w10: U1.56 395.55,949.84 347.91,997.48 242.48,997.48 J1.17 145,1010 145,1895 307.48,2057.48 857.52,2057.48 J3.3
PA.11_Debug_RX: J1.18 J3.4 U1.57 | length 2146.8
  Top Layer w10: v2(220,2015) 110,1905 110,950 150,910 220,910 257.44,947.44 292.44,947.44 J1.18 369.18,955 394.02,930.16 U1.57
  Bottom Layer w10: v2(220,2015) 262.48,2057.48 757.52,2057.48 J3.4
PA.12: J1.30 U1.5 | length 525.3
  Top Layer w10: J1.30 308.57,363.57 348.57,363.57 640.2,655.2 640.2,714.69 U1.5
PA.13: J1.31 U1.6 | length 692.5
  Top Layer w10: J1.31 257.52,312.52 327.52,312.52 660.79,645.79 U1.6
PA.14: J1.32 U1.7 | length 618.2
  Top Layer w10: J1.32 680.47,635.47 U1.7
PA.15: J2.1 U1.8 | length 873.1
  Top Layer w10: U1.8 701.06,714.69 701.06,633.94 1122.48,212.52 1257.52,212.52 J2.1
PA.16: J2.2 U1.9 | length 712.2
  Top Layer w10: U1.9 720.75,714.69 720.75,644.25 1110,255 J2.2
PA.17: J2.3 U1.10 | length 780.2
  Top Layer w10: U1.10 740.43,714.69 740.43,654.57 1082.48,312.52 1257.52,312.52 J2.3
PA.18_BSL: J2.4 J3.1 R5.1 U1.11 | length 3066.8
  Top Layer w10: U1.11 760.12,714.69 760.12,664.88 1070,355 J2.4 ; R5.1 1070,1740 1100,1770 v2(1100,1855) ; J3.1 1155,2015 1435,1735 1435,423.25 1420,408.25 v2(1420,405)
  Bottom Layer w10: v2(1100,1855) J3.1 ; J2.4 1250,405 v2(1420,405)
PA.21: J2.8 R6.2 U1.17 | length 412.3
  Top Layer w10: U1.17 934.41,717.63 1015,637.04 R6.2 1015,629.17 1021.81,622.36 1025.75,622.36 1093.11,555 J2.8
PA.22: J2.9 U1.18 | length 465.8
  Top Layer w10: U1.18 935.31,811.14 968.86,811.14 1167.48,612.52 1257.52,612.52 J2.9
PA.23: C8.1 J2.15 U1.24 | length 408.6
  Top Layer w10: U1.24 1013.28,930.16 1039.44,904 C8.1 1047.32,904 1069.13,925.81 1136.72,925.81 1150.01,912.52 1257.52,912.52 J2.15
PA.24: J2.16 U1.25 | length 267.7
  Top Layer w10: U1.25 935.31,950.75 1195.75,950.75 J2.16
PA.25: J2.17 U1.26 | length 401
  Top Layer w10: U1.26 1114.53,969.53 1150,1005 1210.08,1005 1252.52,1047.44 1292.44,1047.44 J2.17
PA.26: J2.21 U1.30 | length 451.2
  Top Layer w10: U1.30 935.31,1049.17 1019.17,1049.17 1180,1210 1245,1210 1265,1230 1265.13,1230 1290.13,1255 J2.21
PA.27: J2.22 U1.31 | length 343.1
  Top Layer w10: U1.31 935.31,1068.86 998.86,1068.86 1168.93,1238.93 1169.05,1238.93 1185.13,1255 J2.22
PA.28: J2.25 U1.35 | length 725.6
  Top Layer w10: U1.35 818.27,1119.88 830,1108.15 v2(830,1105)
  Bottom Layer w10: v2(830,1105) 830,1108.25 820,1118.25 820,1160 1072.48,1412.48 1217.56,1412.48 1252.52,1447.44 1292.44,1447.44 J2.25
PA.29: J2.26 U1.36 | length 716.5
  Top Layer w10: U1.36 798.58,1116.12 805,1109.7 v2(805,1070)
  Bottom Layer w10: v2(805,1070) 805,1109.7 797.35,1117.35 797.35,1162.35 1090,1455 J2.26
PA.30: J2.27 U1.37 | length 804.3
  Top Layer w9: U1.37 779.45,1163.86 779.45,1105.55 v2(780,1105)
  Bottom Layer w9: v2(780,1105) 780,1170 1110,1500 1245,1500 J2.27
PB.0: J1.8 U1.47 | length 454.4
  Top Layer w10: J1.8 380,1375 380,1315 480,1215 560.21,1215 581.14,1194.06 581.14,1165.31 U1.47
PB.1: J1.9 U1.48 | length 514.9
  Top Layer w10: J1.9 250,1405 320,1405 360,1365 360,1310 505.59,1164.41 U1.48
PB.2: J1.11 U1.50 | length 454.8
  Top Layer w10: J1.11 242.48,1297.48 317.6,1297.48 410,1205.08 410,1108.64 449.78,1068.86 484.69,1068.86 U1.50
PB.3: J1.12 U1.51 | length 313.7
  Top Layer w10: J1.12 314.87,1255 330.95,1238.93 331.07,1238.93 390,1180 390,1107.43 448.25,1049.17 484.69,1049.17 U1.51
PB.4: J1.13 U1.52 | length 413.8
  Top Layer w10: J1.13 250,1205 330,1205 365,1170 365,1111.21 446.72,1029.49 484.69,1029.49 U1.52
PB.5: J1.14 U1.53 | length 246.1
  Top Layer w10: J1.14 446.1,1008.9 U1.53
PB.6: J1.19 U1.58 | length 308.6
  Top Layer w10: J1.19 255.47,910.47 U1.58
PB.7: J1.20 U1.59 | length 200.4
  Top Layer w10: J1.20 335.79,890.79 U1.59
PB.8: J1.21 U1.60 | length 333.7
  Top Layer w10: J1.21 257.52,812.52 317.6,812.52 376.18,871.1 U1.60
PB.9: J1.22 U1.61 | length 225.5
  Top Layer w10: J1.22 396.42,851.42 U1.61
PB.10: J1.23 U1.62 | length 370.5
  Top Layer w10: J1.23 210.52,665.52 210.52,685.52 235,710 315,710 328.49,723.49 ccw(c300,755) 331.51,726.51 436.73,831.73 U1.62
PB.11: J1.24 U1.63 | length 250.8
  Top Layer w10: J1.24 385.51,740.51 385.51,740.71 455.94,811.14 484.69,811.14 U1.63
PB.12: J1.25 U1.64 | length 404.9
  Top Layer w10: J1.25 250,605 320,605 470.54,755.54 470.54,791.46 471.45,792.36 U1.64
PB.13: J1.26 U1.1 | length 342.7
  Top Layer w10: J1.26 425.39,555 562.36,691.97 U1.1
PB.14: J1.27 R10.2 U1.2 | length 1041.2
  Top Layer w10: J1.27 257.52,512.52 407.72,512.52 581.14,685.94 581.14,714.69 U1.2 582.05,777.95 v2(580,780) ; v2(620,395) 621.37,396.37 685.01,396.37 R10.2
  Bottom Layer w10: v2(580,780) 580,435 v2(620,395)
PB.15: J1.28 U1.3 | length 432.4
  Top Layer w10: J1.28 380,455 600.83,675.83 600.83,714.69 U1.3
PB.16: J1.29 U1.4 | length 599.6
  Top Layer w10: J1.29 257.52,412.52 367.52,412.52 620.51,665.51 620.51,714.69 U1.4
PB.17: J2.5 U1.14 | length 671.1
  Top Layer w10: U1.14 818.27,636.73 1042.48,412.52 1257.52,412.52 J2.5
PB.18: J2.6 U1.15 | length 507.2
  Top Layer w10: U1.15 837.95,652.05 1035,455 J2.6
PB.19: J2.7 U1.16 | length 575.3
  Top Layer w10: U1.16 857.64,662.36 1007.48,512.52 1257.52,512.52 J2.7
PB.20: J2.10 U1.19 | length 338.8
  Top Layer w10: U1.19 935.31,830.83 974.32,830.83 1150.15,655 J2.10
PB.21: J2.11 S2.2 U1.20 | length 1411.5
  Top Layer w10: U1.20 935.31,850.51 975.85,850.51 1113.84,712.52 1257.52,712.52 J2.11 1306.07,748.93 1341.07,748.93 1365,725 1365,225 1220,80 S2.2
PB.22: J2.12 U1.21 | length 313.7
  Top Layer w10: U1.21 935.31,870.2 977.38,870.2 1092.57,755 J2.12
PB.23: J2.13 U1.22 | length 417.7
  Top Layer w10: U1.22 935.31,889.88 978.91,889.88 1058.79,810 1255,810 J2.13
PB.24: J2.14 U1.23 | length 288.6
  Top Layer w10: U1.23 934.6,910.28 979.72,910.28 1035,855 J2.14
PB.25: J2.18 U1.27 | length 292.8
  Top Layer w10: U1.27 1089.21,989.21 1155,1055 J2.18
PB.26: J2.19 U1.28 | length 426.1
  Top Layer w10: U1.28 1058.9,1008.9 1155,1105 1210.08,1105 1252.52,1147.44 1292.44,1147.44 J2.19
PB.27: J2.20 U1.29 | length 318
  Top Layer w10: U1.29 935.31,1029.49 1039.49,1029.49 1158.93,1148.93 1193.93,1148.93 J2.20
R\S\T\: C9.1 J2.28 J3.2 R12.1 S1.2 U1.38 | length 4209.2
  Top Layer w9: S1.2 631.69,71.14 662.83,40 1225,40 1390,205 1390,1600 ; v2@759.21,1077.73 U1.38 ; C9.1 937.85,1595.77 941.79,1595.77 982.56,1555 J2.28 1245,1600 1390,1600 ; J3.2 1065,1950 1170,1950 1390,1730 1390,1600
  Bottom Layer w9: v2(755,1070) 755,1073.52 760,1078.52 760,1096.01 759.5,1096.51 759.5,1169.5 1145,1555 J2.28
SWCLK: J3.5 U1.13 | length 1601.2
  Top Layer w10: v2(540,1110) 798.58,851.42 U1.13
  Bottom Layer w10: v2(540,1110) 385,1265 385,1700 J3.5
SWDIO: J3.6 U1.12 | length 1572.3
  Top Layer w10: v2(540.29,1066.59) 540.29,1064.71 778.9,826.1 U1.12
  Bottom Layer w10: v2(540.29,1066.59) 360,1246.89 360,1775 J3.6
VBAT: C10.1 J2.29 U1.39 | length 968.1
  Top Layer w10: U1.39 740.43,1165.31 740.43,1194.06 750.31,1203.94 863.38,1203.94 882.44,1223 C10.1 890.32,1223 986.32,1319 v1(1015,1319)
  Bottom Layer w10: v1(1015,1319) 1093.48,1397.48 1302.56,1397.48 1342.48,1437.4 1342.48,1572.6 1307.56,1607.52 1307.56,1647.44 J2.29
pads on no net: FID1.1 FID2.1 FID3.1 SH-J1.0
copper on no net:
  other v3: 100,105 1400,105 100,1985 1400,1985

## Polygon pours and split planes (outlines as drawn)
GND on Bottom Layer "GND_Bottom" (solid, remove dead copper, pour order 0): 4.17,7.32 5.98,9.13 1500.01,9.13 1500.01,2074.99 1495,2080 10,2080
GND on Top Layer "GND_Top" (solid, remove dead copper, pour order 1): 4.17,7.32 5.98,9.13 1500.01,9.13 1500.01,2074.99 1495,2080 10,2080

## Other copper
Top Layer:
  pour cut-out: 640,1350 640,1267 790,1267 790,1350
  pour cut-out: 435,1463 584.97,1463 585,1462.98 585,1347 584.48,1347.52 435.79,1347.52
  pour cut-out: 435,1463 584.97,1463
Bottom Layer:
  pour cut-out: 640,1350 640,1267 790,1267 790,1350
  pour cut-out: 435,1463 435,1347 585,1347 585,1463

## Silkscreen, mask and mechanical layers (free items; w line width, h text height)
Top Overlay:
  text "(PA11)" at 765.5,1944.5 h24 r270
  text ">>RXD" at 800.5,1944.5 h24 r270
  text "3V3" at 385.5,1939.5 h24 r270
  text "GND" at 485.5,1939.5 h24 r270
  text "SWDIO" at 585.5,1939.5 h24 r270
  text "SWCLK" at 685.5,1939.5 h24 r270
  text "(PA10)" at 870.5,1939.5 h24 r270
  text "<<TXD" at 905.5,1939.5 h24 r270
  text "NRST" at 985.5,1939.5 h24 r270
  text "BSL" at 1085.5,1939.5 h24 r270
  text "3V3" at 50.5,1740.5 h24
  text "GND" at 360.5,1740.5 h24
  text "GND" at 1073.49,1740.5 h24
  text "3V3" at 1365.5,1740.5 h24
  text "PA2" at 50.5,1640.5 h24
  text "PA3" at 360.5,1640.5 h24
  text "GND" at 1073.49,1640.5 h24
  text "VBAT" at 1365.5,1640.5 h24
  text "PA4" at 50.5,1540.5 h24
  text "PA5" at 360.5,1540.5 h24
  text "NRST" at 1050.5,1540.5 h24
  text "PA30" at 1365.5,1540.5 h24
  text "PA6" at 50.5,1440.5 h24
  text "PB0" at 360.5,1440.5 h24
  text "PA29" at 1050.5,1440.5 h24
  text "PA28" at 1365.5,1440.5 h24
  text "PB1" at 50.5,1340.5 h24
  text "PA7" at 360.5,1340.5 h24
  text "PA1" at 1081.16,1340.5 h24
  text "PA0" at 1365.5,1340.5 h24
  text "PB2" at 50.5,1240.5 h24
  text "PB3" at 360.5,1240.5 h24
  text "PA27" at 1050.5,1240.5 h24
  text "PA26" at 1365.5,1240.5 h24
  text "PB4" at 50.5,1140.5 h24
  text "PB5" at 360.5,1140.5 h24
  text "PB27" at 1050.5,1140.5 h24
  text "PB26" at 1365.5,1140.5 h24
  text "PA8" at 50.5,1040.5 h24
  text "PA9" at 360.5,1040.5 h24
  text "PB25" at 1050.5,1040.5 h24
  text "PA25" at 1365.5,1040.5 h24
  text "PA10" at 50.5,940.5 h24
  text "PA11" at 360.5,940.5 h24
  text "PA24" at 1050.5,940.5 h24
  text "PA23" at 1365.5,940.5 h24
  text "PB6" at 50.5,840.5 h24
  text "PB7" at 360.5,840.5 h24
  text "PB24" at 1050.5,840.5 h24
  text "PB23" at 1365.5,840.5 h24
  text "PB8" at 50.5,740.5 h24
  text "PB9" at 360.5,740.5 h24
  text "PB22" at 1050.5,740.5 h24
  text "PB21" at 1365.5,740.5 h24
  text "PB10" at 50.5,640.5 h24
  text "PB11" at 360.5,640.5 h24
  text "PB20" at 1050.5,640.5 h24
  text "PA22" at 1365.5,640.5 h24
  text "MSP-LITO-L2228" at 515.86,541.2 h30
  text "PB12" at 50.5,540.5 h24
  text "PB13" at 360.5,540.5 h24
  text "PA21" at 1058.16,540.5 h24
  text "PB19" at 1365.5,540.5 h24
  text "PB14" at 50.5,440.5 h24
  text "PB15" at 360.5,440.5 h24
  text "(PB14)" at 830.5,440.5 h24
  text "PB18" at 1054.33,440.5 h24
  text "PB17" at 1365.5,440.5 h24
  text "PB16" at 50.5,340.5 h24
  text "PA12" at 360.5,340.5 h24
  text "PA18" at 1054.33,340.5 h24
  text "PA17" at 1365.5,340.5 h24
  text "PA13" at 50.5,240.5 h24
  text "PA14" at 360.5,240.5 h24
  text "PA16" at 1054.33,240.5 h24
  text "PA15" at 1365.5,240.5 h24
  text "(NRST)" at 525.76,156.62 h24
  text "(PB21)" at 930.23,153.86 h24
Bottom Overlay:
  text "MSP-LITO-L2228" at 800,1900 h45 r90
  text "3V3" at 134.5,1740.5 h24
  text "GND" at 444.5,1740.5 h24
  text "GND" at 1135.16,1740.5 h24
  text "3V3" at 1454.5,1740.5 h24
  text "PA2" at 134.5,1640.5 h24
  text "PA3" at 444.5,1640.5 h24
  text "GND" at 1135.16,1640.5 h24
  text "VBAT" at 1454.5,1640.5 h24
  text "PA4" at 134.5,1540.5 h24
  text "PA5" at 444.5,1540.5 h24
  text "NRST" at 1135.16,1540.5 h24
  text "PA30" at 1454.5,1540.5 h24
  text "PA6" at 134.5,1440.5 h24
  text "PB0" at 444.5,1440.5 h24
  text "PA29" at 1135.16,1440.5 h24
  text "PA28" at 1454.5,1440.5 h24
  text "PB1" at 134.5,1340.5 h24
  text "PA7" at 444.5,1340.5 h24
  text "PA1" at 1135.16,1340.5 h24
  text "PA0" at 1454.5,1340.5 h24
  text "PB2" at 134.5,1240.5 h24
  text "PB3" at 444.5,1240.5 h24
  text "PA27" at 1135.16,1240.5 h24
  text "PA26" at 1454.5,1240.5 h24
  text "PB4" at 134.5,1140.5 h24
  text "PB5" at 444.5,1140.5 h24
  text "PB27" at 1135.16,1140.5 h24
  text "PB26" at 1454.5,1140.5 h24
  text "PA8" at 134.5,1040.5 h24
  text "PA9" at 444.5,1040.5 h24
  text "PB25" at 1135.16,1040.5 h24
  text "PA25" at 1454.5,1040.5 h24
  text "PA10" at 134.5,940.5 h24
  text "PA11" at 444.5,940.5 h24
  text "PA24" at 1135.16,940.5 h24
  text "PA23" at 1454.5,940.5 h24
  text "PB6" at 134.5,840.5 h24
  text "PB7" at 444.5,840.5 h24
  text "PB24" at 1135.16,840.5 h24
  text "PB23" at 1454.5,840.5 h24
  text "PB8" at 134.5,740.5 h24
  text "PB9" at 444.5,740.5 h24
  text "PB22" at 1135.16,740.5 h24
  text "PB21" at 1454.5,740.5 h24
  text "PB10" at 134.5,640.5 h24
  text "PB11" at 444.5,640.5 h24
  text "PB20" at 1135.16,640.5 h24
  text "PA22" at 1454.5,640.5 h24
  text "PB12" at 134.5,540.5 h24
  text "PB13" at 444.5,540.5 h24
  text "PA21" at 1135.16,540.5 h24
  text "PB19" at 1454.5,540.5 h24
  text "PB14" at 134.5,440.5 h24
  text "PB15" at 444.5,440.5 h24
  text "PB18" at 1135.16,440.5 h24
  text "PB17" at 1454.5,440.5 h24
  text "PB16" at 134.5,340.5 h24
  text "PA12" at 444.5,340.5 h24
  text "PA18" at 1135.16,340.5 h24
  text "PA17" at 1454.5,340.5 h24
  text "PA13" at 134.5,240.5 h24
  text "PA14" at 444.5,240.5 h24
  text "PA16" at 1135.16,240.5 h24
  text "PA15" at 1454.5,240.5 h24
Mechanical 1:
  lines w10: 1440,2080 cw(c1435,2015) 1500,2020 1500,45 cw(c1460,45) 1460,5 60,5 cw(c60,59.98) 5.02,59.98 5.02,2029.98 cw(c55,2030) 55,2080 1450,2080

## Text inside footprints (layer, text, board x,y; h text height)
Logo3: Bottom Overlay "For evaluation only; not FCC approved for resale." at 985,1905 h60 r90